# Altium PCB HSR_V2 - Copy.PcbDoc
Units mm, origin at the board's own origin, x right, y up, seen from the top; angles counter-clockwise.
Board outline 140 x 140 mm, 2 copper layers (Top Layer, Bottom Layer), stack 0.533 mm thick; 37 components, 46 nets, 224 pads, 805 vias.
Unrouted connection lines stored in the file: 1.
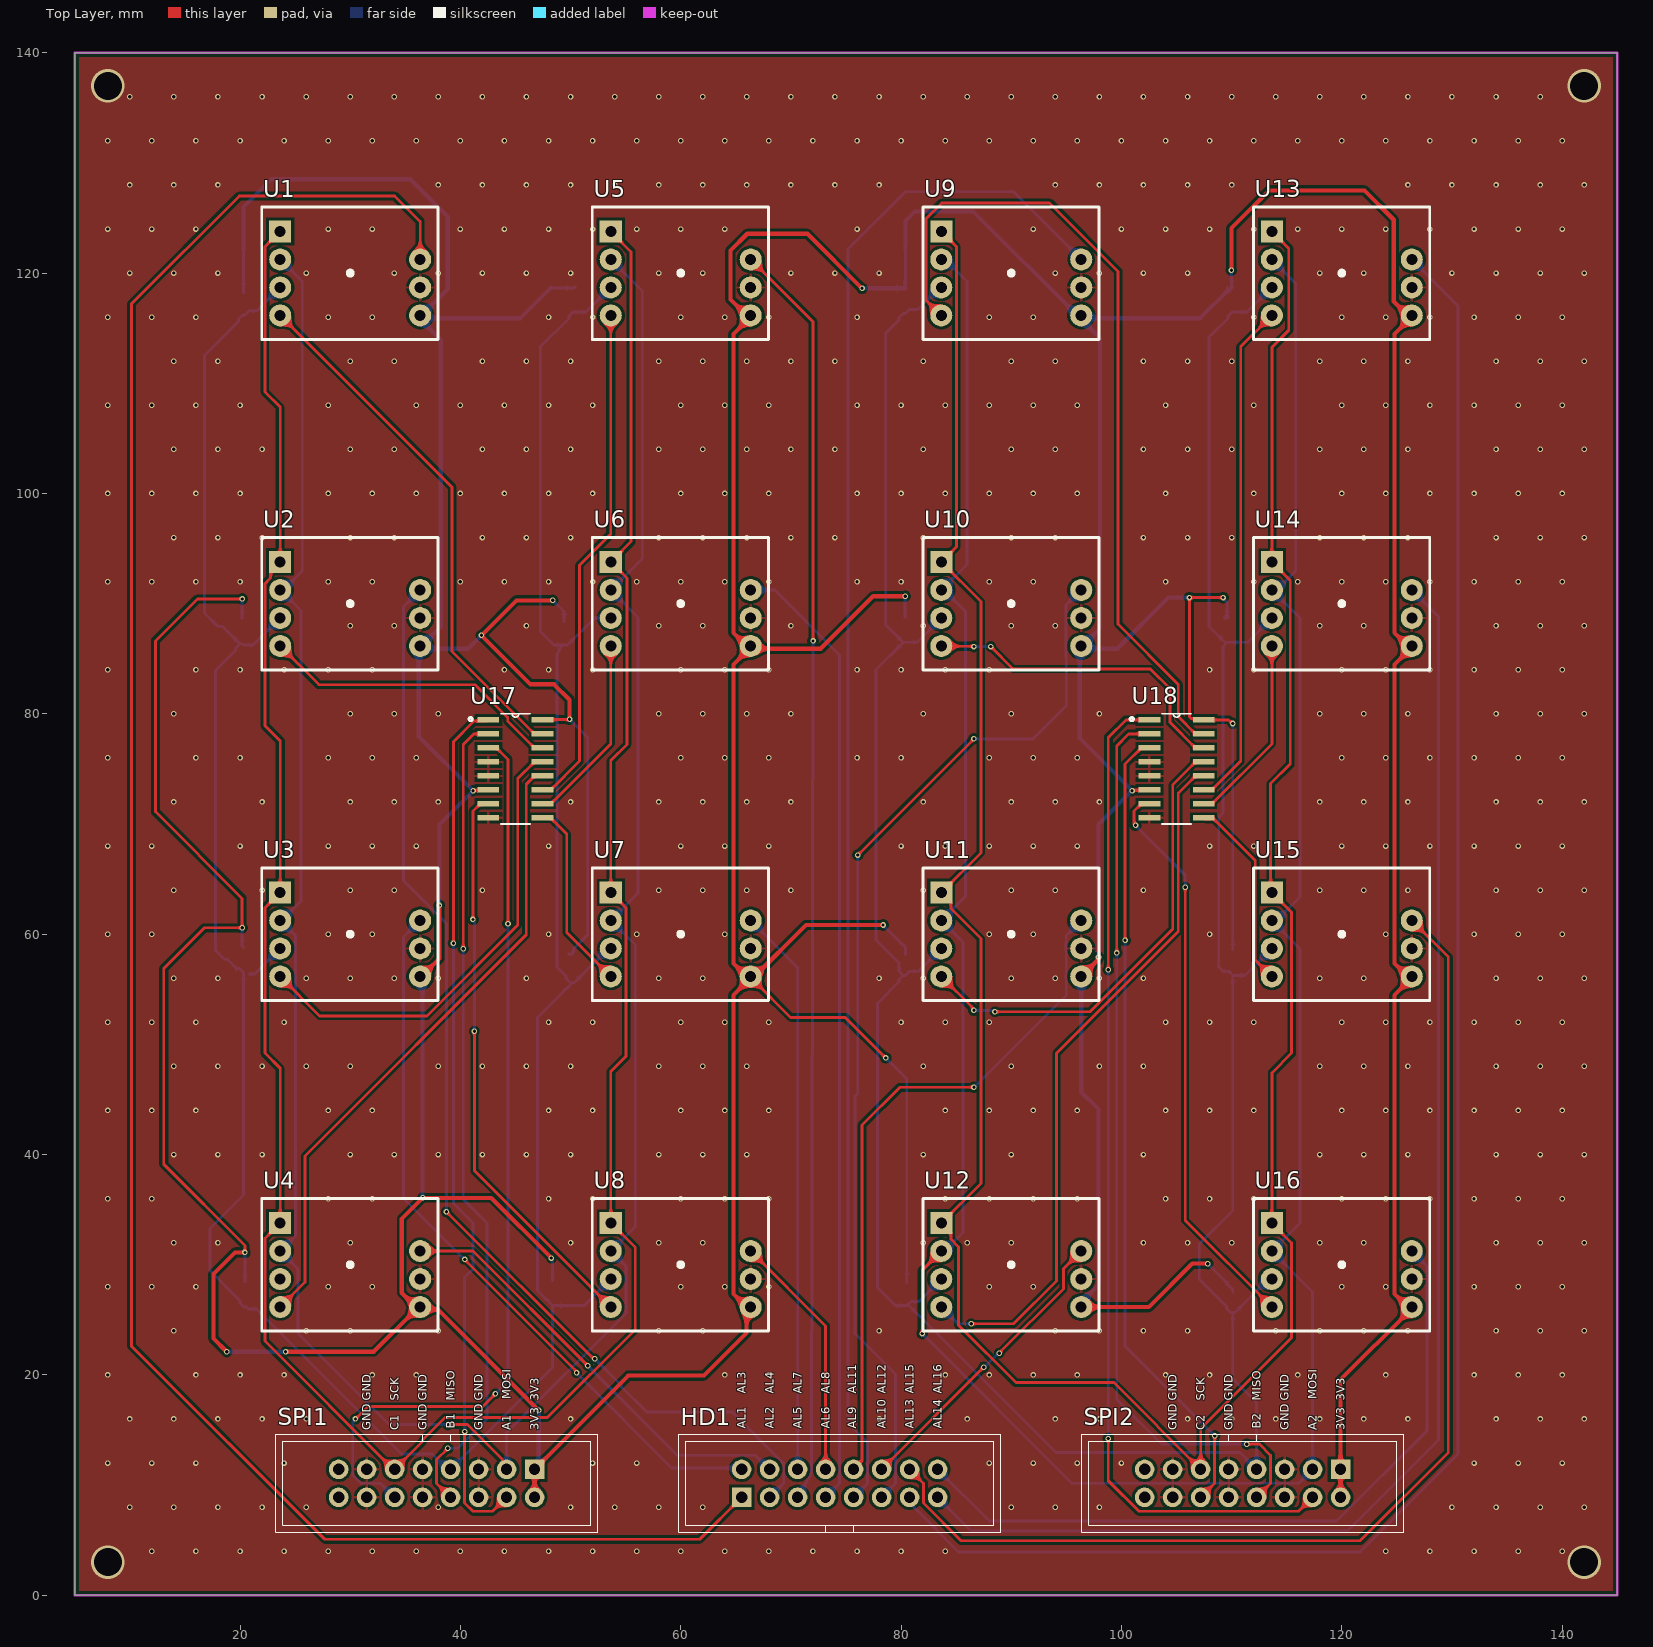
[diagram p0: Top Layer view]
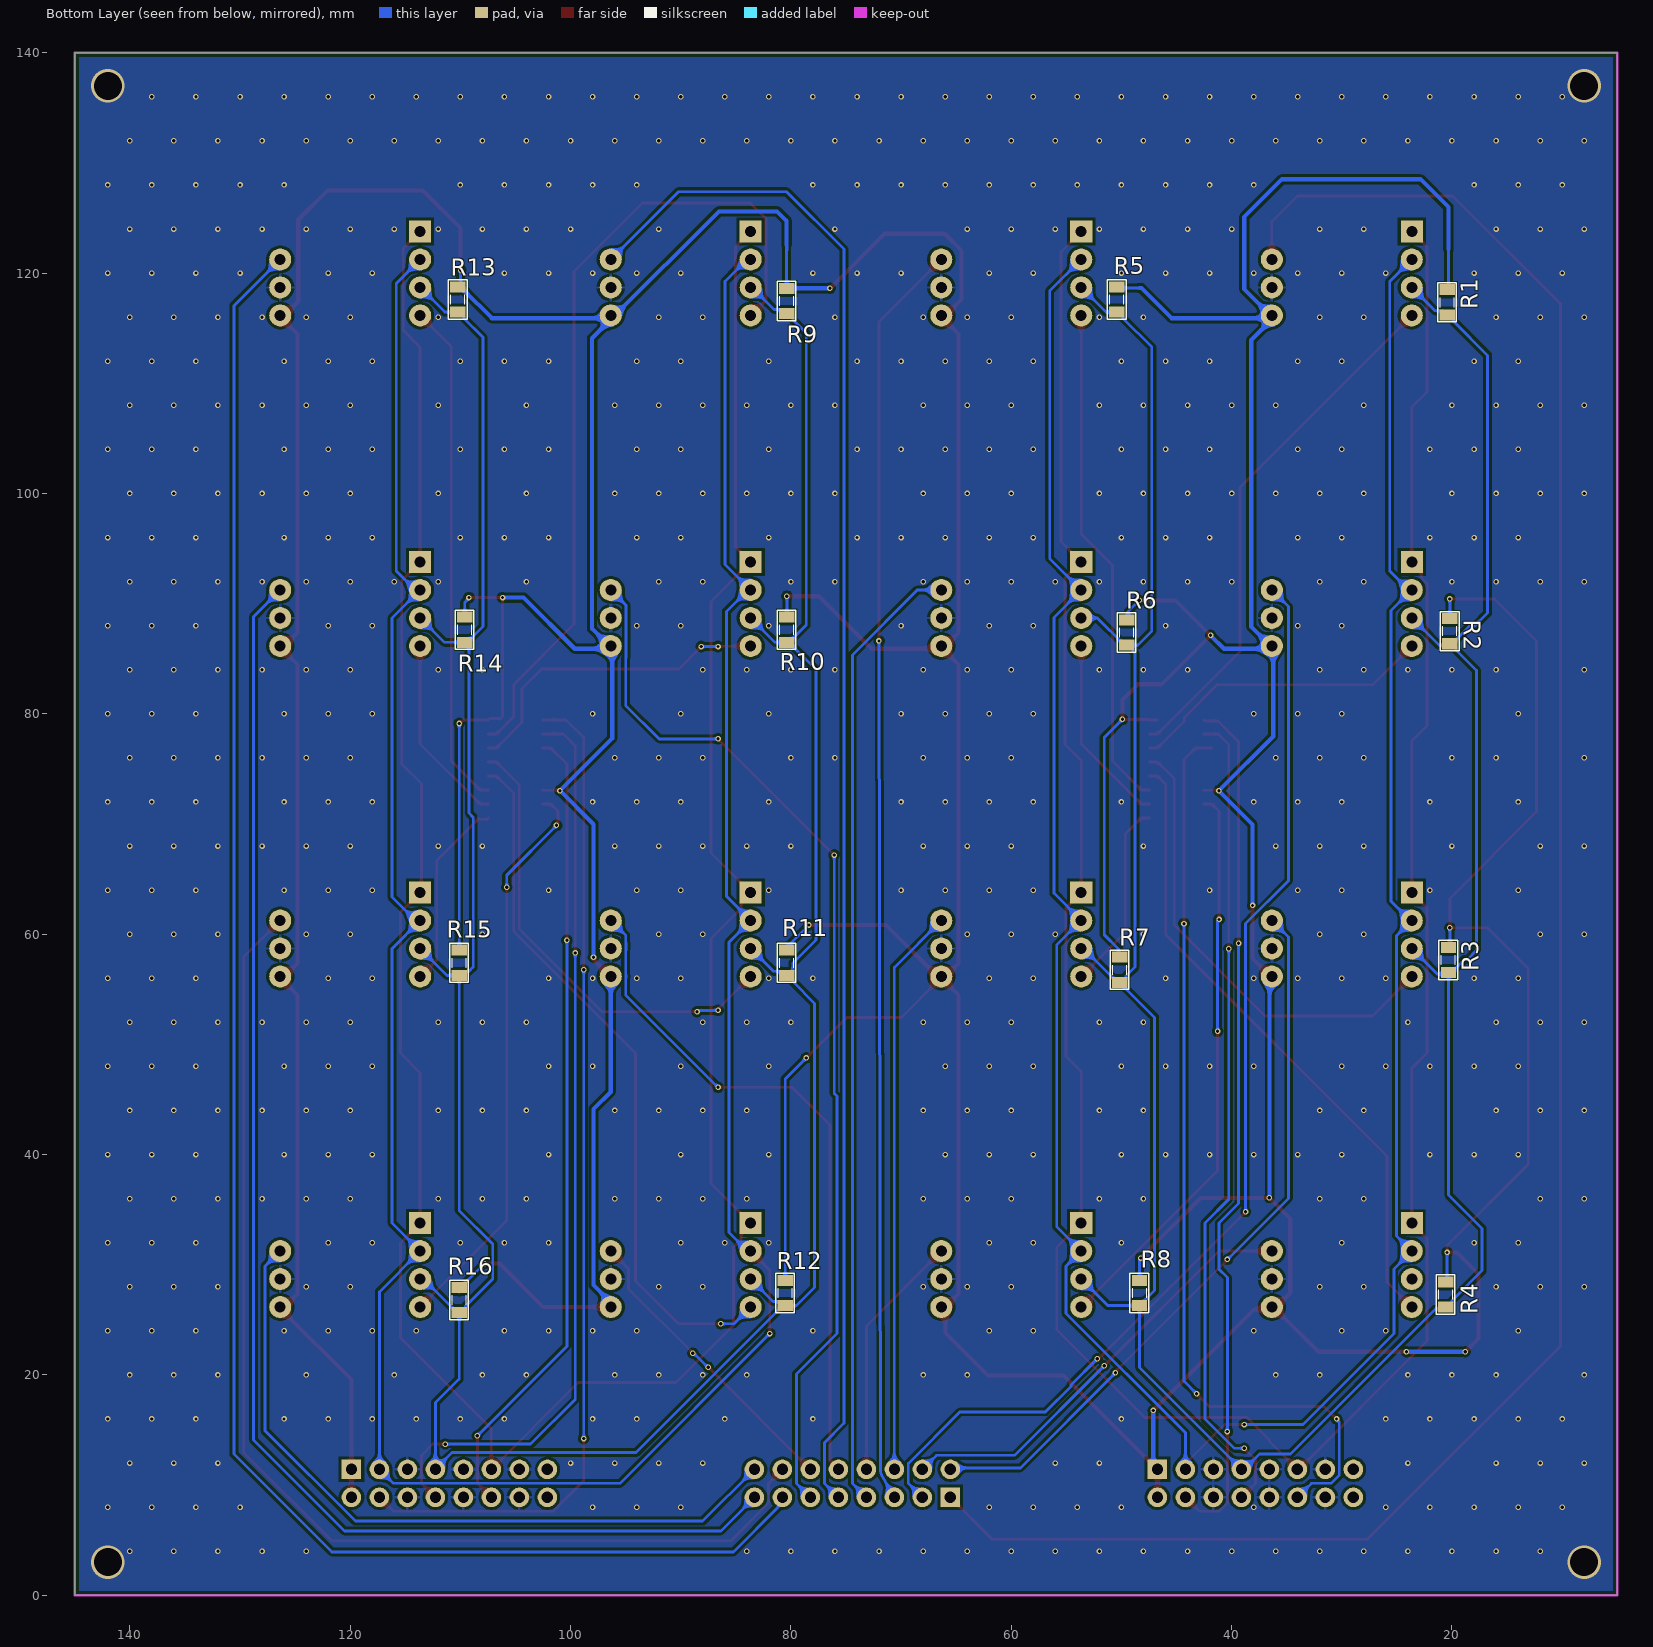
[diagram p1: Bottom Layer view, seen from below]
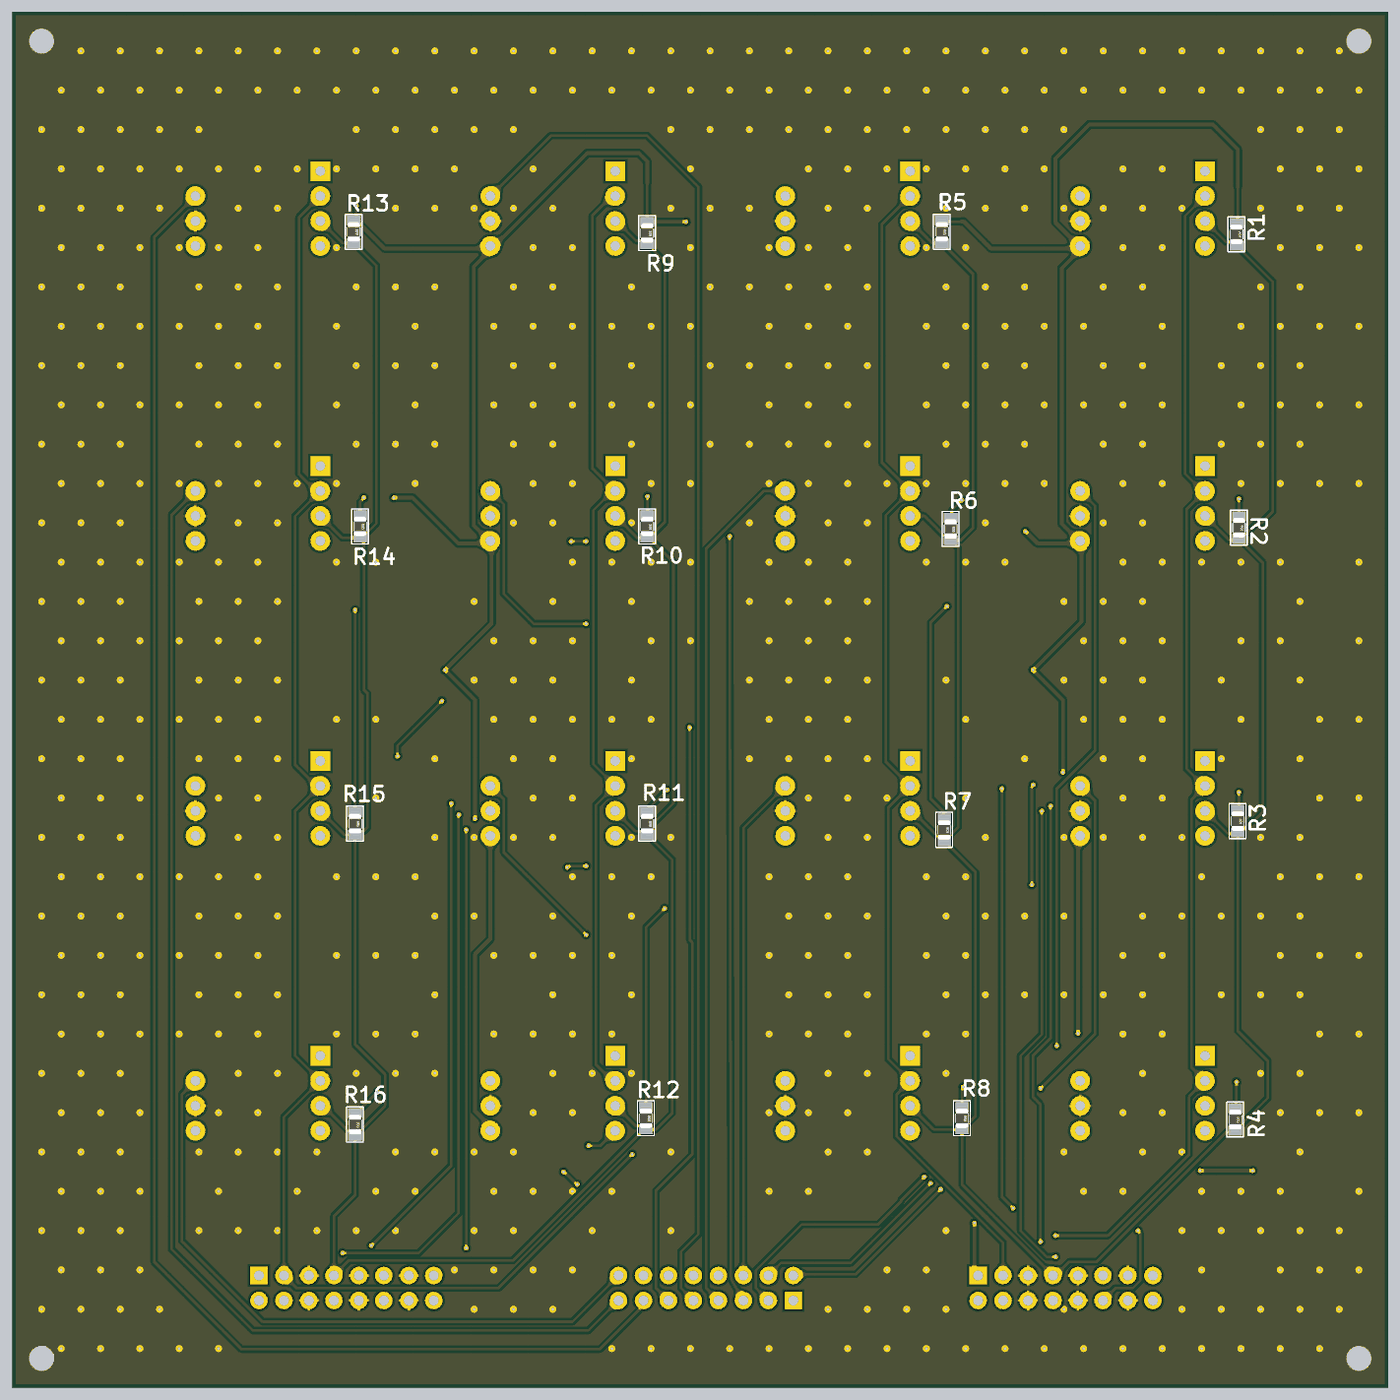
[diagram p2: 3D render of the assembled board from below, using the file's embedded part models]

## Layer stack, top to bottom
Top Solder: solder mask 0.0102, Solder Resist, Dk 3.5
Top Layer: signal copper 0.0356
Dielectric 2: prepreg 0.0711, PP-006, Dk 4.1
Dielectric 1: dielectric 0.32, FR-4, Dk 4.8
Dielectric 3: prepreg 0.0711, PP-006, Dk 4.1
Bottom Layer: signal copper 0.0356
Bottom Solder: solder mask 0.0102, Solder Resist, Dk 3.5

## Board outline
5,0 5,140 145,140 145,0

## Design rules (kind name [scope] priority, off if disabled: settings)
Clearance [All] p1: gap=0.254 ignorepadtopadclearanceinfootprint=FALSE
PolygonConnect [All] p1: connectstyle=Relief reliefconductorwidth=0.254 reliefentries=4 polygonreliefangle="90 Angle" airgapwidth=0.254
RoutingVias [All] p1: holewidth=0.3 width=0.5 viastyle="Through Hole" minholewidth=0.2 minwidth=0.3 maxholewidth=0.711 maxwidth=1.27
SolderMaskExpansion [All] p1: expansion=0.102 istentingtop=FALSE
Width [All] p1: maxlimit=0.762 minlimit=0.254 preferedwidth=0.254 minimp=50.000000 maximp=50.000000 favimp=50.000000
30 further rules are at their usual default settings.

## Classes and differential pairs
component class Sheet2: HD1 R1 R2 R3 R4 R5 R6 R7 R8 R9 R10 R11 R12 R13 R14 R15 R16 SPI1 SPI2 U1 U4 U5 U6 U7 U8 U9 U10 U11 U12 U13 U14 U15 U16 U17 U18

## Components (designator, comment, footprint, x,y, rotation, side; value= is the part's Value field where it differs from the comment)
HD1 "IDC 8X2" IDC16 65.532,8.89 r0 top value="Header 5x2"
R1 "10k" RES-SMD-0805 20.447,117.348 r270 bottom
R2 "10k" RES-SMD-0805 20.193,87.503 r270 bottom
R3 "10k" RES-SMD-0805 20.32,57.658 r270 bottom
R4 "10k" RES-SMD-0805 20.574,27.305 r270 bottom
R5 "10k" RES-SMD-0805 50.419,117.602 r270 bottom
R6 "10k" RES-SMD-0805 49.53,87.376 r270 bottom
R7 "10k" RES-SMD-0805 50.165,56.769 r270 bottom
R8 "10k" RES-SMD-0805 48.362,27.432 r270 bottom
R9 "10k" RES-SMD-0805 80.391,117.475 r270 bottom
R10 "10k" RES-SMD-0805 80.391,87.63 r270 bottom
R11 "10k" RES-SMD-0805 80.391,57.404 r270 bottom
R12 "10k" RES-SMD-0805 80.518,27.432 r270 bottom
R13 "10k" RES-SMD-0805 110.236,117.602 r270 bottom
R14 "10k" RES-SMD-0805 109.601,87.63 r270 bottom
R15 "10k" RES-SMD-0805 110.109,57.404 r270 bottom
R16 "10k" RES-SMD-0805 110.109,26.797 r270 bottom
SPI1 "IDC 8X2" IDC16 46.736,11.43 r180 top value="Header 5x2"
SPI2 "IDC 8X2" IDC16 119.888,11.43 r180 top value="Header 5x2"
U1 "TMAG5170_MODULE" "PCBComponent_1 - duplicate" 30,120 r0 top
U2 "TMAG5170_MODULE" "PCBComponent_1 - duplicate" 30,90 r0 top
U3 "TMAG5170_MODULE" "PCBComponent_1 - duplicate" 30,60 r0 top
U4 "TMAG5170_MODULE" "PCBComponent_1 - duplicate" 30,30 r0 top
U5 "TMAG5170_MODULE" "PCBComponent_1 - duplicate" 60,120 r0 top
U6 "TMAG5170_MODULE" "PCBComponent_1 - duplicate" 60,90 r0 top
U7 "TMAG5170_MODULE" "PCBComponent_1 - duplicate" 60,60 r0 top
U8 "TMAG5170_MODULE" "PCBComponent_1 - duplicate" 60,30 r0 top
U9 "TMAG5170_MODULE" "PCBComponent_1 - duplicate" 90,120 r0 top
U10 "TMAG5170_MODULE" "PCBComponent_1 - duplicate" 90,90 r0 top
U11 "TMAG5170_MODULE" "PCBComponent_1 - duplicate" 90,60 r0 top
U12 "TMAG5170_MODULE" "PCBComponent_1 - duplicate" 90,30 r0 top
U13 "TMAG5170_MODULE" "PCBComponent_1 - duplicate" 120,120 r0 top
U14 "TMAG5170_MODULE" "PCBComponent_1 - duplicate" 120,90 r0 top
U15 "TMAG5170_MODULE" "PCBComponent_1 - duplicate" 120,60 r0 top
U16 "TMAG5170_MODULE" "PCBComponent_1 - duplicate" 120,30 r0 top
U17 "SN74LVC138AD" SOIC127P600X175-16N 45,75 r0 top
U18 "SN74LVC138AD" SOIC127P600X175-16N 105,75 r0 top

## Footprints (in the part's own frame and the unit in brackets; to place one, negate y for a bottom-side part, rotate by r counter-clockwise, add the part's x,y. Pads: shape width x height; smd on the part's side, far side on the other; paste and mask are expansions set on the pad)
IDC16 [mil]
  rect 70x70 hole 40: 1(0,0)
  round 70 hole 40: 2(0,100) 3(100,0) 4(100,100) 5(200,0) 6(200,100) 7(300,0) 8(300,100) 9(400,0) 10(400,100) 11(500,0) 12(500,100) 13(600,0) 14(600,100) 15(700,0) 16(700,100)
  silkscreen extent -225,-125 925,225, body extent -225,-125 926,225, height 358
"PCBComponent_1 - duplicate" [mm]
  rect 2x2 hole 1 mask+0.05: 1(-6.35,3.778)
  round 2 hole 1 mask+0.05: 2(-6.35,1.238) 3(-6.35,-1.302) 4(-6.35,-3.842) 5(6.35,-3.842) 6(6.35,1.238) 7(6.35,-1.302)
  silkscreen extent -8.02,-6.03 7.97,6
RES-SMD-0805 [mm]
  rect 1x1.397 smd: 1(-1.143,0) 2(1.143,0)
  silkscreen extent -1.78,-0.86 1.78,0.84, body extent -1,-0.62 1,0.63, height 0.8
SOIC127P600X175-16N [mil]
  rect 78x20 smd: 1(-97,175) 2(-97,125) 3(-97,75) 4(-97,25) 5(-97,-25) 6(-97,-75) 7(-97,-125) 8(-97,-175) 9(97,-175) 10(97,-125) 11(97,-75) 12(97,-25) 13(97,25) 14(97,75) 15(97,125) 16(97,175)
  silkscreen extent -166,-197 52,197, body extent -118,-195 118,195, height 69

## Part data
HD1 SPI1 SPI2: library part "IDC 8x2"
R1 R2 R3 R4 R5 R6 R7 R8 R9 R10 R11 R12 R13 R14 R15 R16: library part "Resistor - SMD", "Resistor SMD", Manufacturer="Generic Components", Class=Passive, Published=08/06/2000, Publisher="Altium Hobart Technology Centre"
U1 U2 U3 U4 U5 U6 U7 U8 U9 U10 U11 U12 U13 U14 U15 U16: "Module TMAG5170 Hall sensor"
U17 U18: "3-Line To 8-Line decoder/Demultiplexer", Package="SOIC-16 Texas Instruments", Check_prices=https://www.snapeda.com/parts/SN74LVC138AD/Texas+Instruments/view-part/?ref=eda, MF="Texas Instruments", MP=SN74LVC138AD, SnapEDA_Link=https://www.snapeda.com/parts/SN74LVC138AD/Texas+Instruments/view-part/?ref=snap

## Via types
v1: diameter 0.5, hole 0.3, Top Layer to Bottom Layer, 742 vias
v2: diameter 0.5, hole 0.3, Top Layer to Bottom Layer, tented top, 59 vias
v3: diameter 3.048, hole 2.54, Top Layer to Bottom Layer, tented top, 4 vias

## Nets (pads, with @x,y where several pads share a name; then routed paths per layer and width w, separated by ;. In a path a pad name is that pad's centre, name@x,y a point inside that pad or via, vN(x,y) a via of type N, cw(c..) or ccw(c..) an arc to the next point about the centre after c; other vN are vias at no path point)
3V3: R1.1 R2.1 R3.1 R4.1 R5.1 R6.1 R7.1 R8.1 R9.1 R10.1 R11.1 R12.1 R13.1 R14.1 R15.1 R16.1 SPI1.1 SPI1.2 SPI2.1 SPI2.2 U1.5 U2.5 U3.5 U4.5 U5.5 U6.5 U7.5 U8.5 U9.5 U10.5 U11.5 U12.5 U13.5 U14.5 U15.5 U16.5 U17.6 U17.16 U18.6 U18.16 | length 930.7
  Top Layer w0.254: v2(20.193,90.424) 16.129,90.424 12.319,86.614 12.319,71.12 20.193,63.246 v2(20.193,60.579) 16.764,60.579 13.081,56.896 13.081,39.116 20.447,31.75 v2(20.447,31.115) ; v2(41.148,73.025) 41.183,73.06 42.501,73.06 U17.6 ; U17.16@46.727,79.445 U17.16 47.492,79.474 49.883,79.474 v2(49.911,79.502) ; U7.5@66.52,55.908 69.977,52.451 74.93,52.451 v2(78.613,48.768) ; v2(100.965,73.025) 101,73.06 102.501,73.06 U18.6 ; v2(109.22,90.551) v2(106.172,90.551) 106.172,79.721 106.321,79.572 107.337,79.572 U18.16 109.718,79.445 110.042,79.121 v2(110.109,79.121)
  Top Layer w0.381: v2(18.796,22.098) 17.59,23.304 17.59,29.146 19.558,31.115 v2(20.447,31.115) ; v2(24.13,22.098) 32.131,22.098 35.941,25.908 U4.5@36.223,25.908 ; U3.5@36.223,55.908 36.223,55.917 38.1,57.794 v2(38.1,62.611) ; U4.5@36.239,25.908 U4.5@36.223,25.908 ; U4.5 36.581,25.927 37.954,25.927 v2(47.109,16.772) ; SPI1.2 SPI1.1 55.245,19.939 62.103,19.939 65.973,23.809 65.973,25.657 66.223,25.908 64.779,27.352 64.779,54.463 U7.5@66.223,55.908 ; v2(48.26,30.607) 42.799,36.068 v2(36.576,36.068) 34.671,34.163 34.671,27.46 U4.5@36.223,25.908 ; v2(48.387,90.297) 45.085,90.297 v2(41.91,87.122) 46.355,82.677 48.514,82.677 49.911,81.28 v2(49.911,79.502) ; v2(76.454,118.618) 71.501,123.571 66.04,123.571 64.516,122.047 64.516,117.615 66.223,115.908 64.779,114.463 64.779,87.352 U6.5@66.223,85.908 ; v2(78.359,60.833) 71.374,60.833 66.449,55.908 U7.5@66.223,55.908 ; v2(80.366,90.678) 77.47,90.678 72.7,85.908 U6.5@66.223,85.908 ; U12.5 102.485,26.158 106.426,30.099 v2@107.791,30.099 ; U11.5 97.894,57.702 97.894,57.889 v2(97.917,57.912) ; v2(109.982,120.269) 109.982,124.079 113.411,127.508 122.047,127.508 124.714,124.841 124.714,117.417 126.223,115.908 124.779,114.463 124.779,87.352 126.223,85.908 124.779,84.463 124.779,57.352 126.223,55.908 124.779,54.463 124.779,27.352 126.223,25.908 119.888,19.572 SPI2.1 SPI2.2 ; U7.5@66.223,55.908 64.779,57.352 64.779,84.463 U6.5@66.223,85.908
  Bottom Layer w0.254: v2(20.193,60.579) 20.193,58.928 R3.1 ; R2.1 v2(20.193,90.424) ; R1.1@20.32,118.217 20.32,122.174 ; R4.1@20.447,28.448 v2(20.447,31.115) ; R8.1 v2@48.362,30.439 ; v2(48.387,90.297) 49.403,89.281 R6.1@49.403,88.363 ; 48.387,118.643 50.317,118.643 R5.1 ; R7.1@49.821,58.203 50.181,58.203 50.262,58.285 50.262,58.644 51.562,59.944 51.562,77.851 v2(49.911,79.502) ; v2(78.359,60.833) 80.391,58.801 R11.1 R11.1@80.391,58.173 ; v2(78.613,48.768) 80.518,46.863 R12.1 R12.1@80.518,28.394 ; v2(80.366,90.678) 80.366,88.798 R10.1 ; R9.1 80.391,122.555 ; v2(107.823,30.099) 109.537,28.384 109.537,28.313 110.038,27.813 110.109,27.813 R16.1@110.109,27.51 ; v2(109.22,90.551) 109.22,90.484 109.601,90.103 R14.1 ; v2(109.982,120.269) 109.982,118.872 R13.1@110.045,118.808 ; R15.1@110.109,58.589 v2(110.109,79.121)
  Bottom Layer w0.381: v2(18.796,22.098) v2(24.13,22.098) ; 20.32,122.174 20.32,125.984 22.86,128.524 35.433,128.524 38.862,125.095 38.862,118.546 U1.5@36.223,115.908 ; U3.5@36.223,55.908 36.553,55.578 36.553,36.091 v2(36.576,36.068) ; v2(38.1,62.611) 38.1,69.953 41.148,73.001 v2(41.148,73.025) 36.223,77.95 U2.5@36.223,85.908 ; v2(41.91,87.122) 40.696,85.908 U2.5@36.223,85.908 ; SPI1.1 47.109,11.803 v2@47.109,16.739 ; 48.387,118.643 48.189,118.643 45.453,115.908 U1.5@36.223,115.908 ; v2(76.454,118.618) R9.1 ; 80.391,122.555 80.391,124.745 81.249,125.603 86.528,125.603 U9.5@96.223,115.908 ; U12.5 96.35,26.596 97.917,28.163 97.917,44.116 96.35,45.683 U11.5 ; v2(97.917,57.912) 97.917,69.977 v2(100.965,73.025) 96.223,77.767 U10.5@96.223,85.908 ; v2(106.172,90.551) 104.267,90.551 99.624,85.908 U10.5@96.223,85.908 ; R14.1 R14.1@109.474,88.773 ; R13.1@110.045,118.808 110.045,118.753 109.728,118.436 109.673,118.436 107.145,115.908 U9.5@96.223,115.908 ; U2.5@36.223,85.908 38.227,87.911 38.227,113.904 U1.5@36.223,115.908 ; U10.5@96.223,85.908 98.044,87.728 98.044,114.087 U9.5@96.223,115.908 ; R14.1@109.474,88.773 109.474,88.702 109.403,88.773 R14.1@109.474,88.773
A1: SPI1.4 U17.1 | length 78.8
  Top Layer w0.254: v2(39.37,59.182) 39.37,77.47 41.239,79.339 42.431,79.339 U17.1 ; v2(40.386,14.859) 40.386,8.364 41.13,7.62 42.926,7.62 SPI1.4
  Bottom Layer w0.254: v2(39.37,59.182) 39.37,35.56 41.148,33.782 41.148,29.591 40.386,28.829 v2(40.386,14.859)
A2: SPI2.4 U18.1 | length 92.1
  Top Layer w0.254: v2(98.806,14.224) 98.806,10.396 101.582,7.62 116.078,7.62 SPI2.4 ; v2(98.806,56.769) 98.806,77.851 100.4,79.445 U18.1
  Bottom Layer w0.254: v2(98.806,14.224) v2(98.806,56.769)
AL1: HD1.1 U1.6 | length 193.5
  Top Layer w0.254: U1.6 36.35,124.686 34.036,127 19.939,127 10.16,117.221 10.16,22.606 27.686,5.08 61.722,5.08 HD1.1
AL2: HD1.3 U2.6 | length 102.4
  Top Layer w0.254: v2(38.735,34.798) 52.023,21.51 52.15,21.51 v2(52.197,21.463)
  Bottom Layer w0.254: U2.6 34.842,89.73 34.842,64.853 38.735,60.96 v2(38.735,34.798) ; v2(52.197,21.463) 54.577,19.083 54.577,18.956 56.91,16.623 64.676,16.623 69.342,11.956 69.342,10.16 HD1.3
AL3: HD1.2 U3.6 | length 66.8
  Top Layer w0.254: v2(40.386,30.48) 50.499,20.367 50.499,20.24 v2(50.546,20.193)
  Bottom Layer w0.254: U3.6 34.842,59.73 34.842,36.024 v2(40.386,30.48) ; v2(50.546,20.193) 59.179,11.56 65.402,11.56 HD1.2
AL4: HD1.4 U4.6 | length 39.9
  Top Layer w0.254: U4.6 41.152,31.238 v2(51.562,20.828)
  Bottom Layer w0.254: v2(51.562,20.828) 59.69,12.7 66.802,12.7 HD1.4
AL5: HD1.5 U5.6 | length 115.7
  Top Layer w0.254: U5.6 72.009,115.579 v2(72.009,86.614)
  Bottom Layer w0.254: HD1.5 71.712,10.795 ; v2(72.009,86.614) 71.882,11.432 ; 71.712,10.795 ccw(c70.612,11.43) 71.882,11.432 ; 71.712,10.795 ccw(c70.612,11.43) 71.882,11.432
AL6: HD1.7 U6.6 | length 87.5
  Bottom Layer w0.254: U6.6 68.528,91.238 74.422,85.344 74.422,10.16 HD1.7
AL7: HD1.6 U7.6 | length 51.6
  Bottom Layer w0.254: U7.6 70.612,56.976 HD1.6
AL8: HD1.8 U8.6 | length 22.6
  Top Layer w0.254: U8.6 73.152,24.436 HD1.8
AL9: HD1.9 U9.6 | length 140.4
  Bottom Layer w0.254: HD1.9 76.962,10.16 76.962,13.843 75.184,15.621 75.184,122.174 80.391,127.381 90.207,127.381 U9.6
AL10: HD1.11 U10.6 | length 96.1
  Top Layer w0.254: v2(76.073,67.183) 76.073,67.185 86.61,77.722 v2(86.61,77.724)
  Bottom Layer w0.254: v2(76.073,67.183) 76.073,45.56 75.819,45.306 75.819,23.749 79.502,20.066 79.502,10.16 HD1.11 ; v2(86.61,77.724) 91.948,77.724 94.996,80.772 94.996,85.065 94.969,85.092 94.969,89.857 U10.6
AL11: HD1.10 U11.6 | length 63.2
  Top Layer w0.254: HD1.10 75.692,11.492 76.454,12.254 76.454,42.676 79.879,46.101 v2(86.61,46.101)
  Bottom Layer w0.254: v2(86.61,46.101) 94.996,54.487 94.996,55.886 ; U11.6 95.07,59.958 94.996,59.884 94.969,58.731 ; 94.969,58.731 ccw(c96.35,58.698) 94.996,58.426 ; 94.969,58.731 ccw(c96.35,58.698) 94.996,58.426 ; 94.996,55.886 cw(c96.35,56.158) 94.996,56.43 ; 94.996,55.886 cw(c96.35,56.158) 94.996,56.43 ; 94.996,56.43 94.996,58.426
AL12: HD1.12 U12.6 | length 27.4
  Top Layer w0.254: HD1.12 v2(87.503,20.701) ; v2(88.9,21.971) 94.742,27.813 94.742,29.63 U12.6
  Bottom Layer w0.254: v2(87.503,20.701) 87.566,20.701 88.837,21.971 v2(88.9,21.971)
AL13: HD1.13 U13.6 | length 166
  Bottom Layer w0.254: HD1.13 80.772,8.478 81.162,8.088 81.162,7.992 85.217,3.937 121.666,3.937 130.556,12.827 130.556,117.032 U13.6
AL14: HD1.15 U14.6 | length 128.3
  Bottom Layer w0.254: HD1.15 86.36,5.842 120.523,5.842 128.778,14.097 128.778,88.81 U14.6
AL15: HD1.14 U15.6 | length 105.6
  Top Layer w0.254: HD1.14 82.042,10.16 82.042,8.364 85.453,4.953 121.666,4.953 129.667,12.954 129.667,57.921 U15.6
AL16: HD1.16 U16.6 | length 66.6
  Bottom Layer w0.254: HD1.16 88.011,6.731 119.525,6.731 127.731,14.937 127.731,29.857 U16.6
B1: SPI1.8 U17.2 | length 74.8
  Top Layer w0.254: v2(38.862,13.335) 37.846,12.319 37.846,10.16 SPI1.8 ; v2(40.259,58.674) 40.259,77.216 41.218,78.175 U17.2
  Bottom Layer w0.254: v2(38.862,13.335) 39.754,13.335 42.418,15.999 42.418,33.782 40.259,35.941 v2(40.259,58.674)
B2: SPI2.8 U18.2 | length 83.1
  Top Layer w0.254: v2(99.568,58.293) 99.568,77.089 100.654,78.175 U18.2 ; v2(111.379,13.716) 112.522,13.716 113.538,12.7 113.538,10.16 SPI2.8
  Bottom Layer w0.254: v2(99.568,58.293) 99.568,17.78 103.632,13.716 v2(111.379,13.716)
C1: SPI1.12 U17.3 | length 84.7
  Top Layer w0.254: v2(30.48,16.002) 31.623,17.145 42.037,17.145 v2(43.18,18.288) ; SPI1.12@33.909,9.017 SPI1.12 ; U17.3@41.8,76.905 U17.3 43.273,76.905 44.323,75.855 v2(44.323,60.96)
  Bottom Layer w0.254: v2(30.48,16.002) 30.48,15.935 30.226,15.681 30.226,10.904 30.97,10.16 32.766,10.16 SPI1.12 ; v2(43.18,18.288) 44.323,19.431 v2(44.323,60.96)
C2: SPI2.12 U18.3 | length 73.3
  Top Layer w0.254: v2(100.33,59.436) 100.33,75.435 101.8,76.905 U18.3 ; SPI2.12 108.458,10.16 v2(108.458,14.478)
  Bottom Layer w0.254: v2(100.33,59.436) 100.33,22.606 v2(108.458,14.478)
GND: SPI1.5 SPI1.6 SPI1.9 SPI1.10 SPI1.13 SPI1.14 SPI2.5 SPI2.6 SPI2.9 SPI2.10 SPI2.13 SPI2.14 U1.7 U2.7 U3.7 U4.7 U5.7 U6.7 U7.7 U8.7 U9.7 U10.7 U11.7 U12.7 U13.7 U14.7 U15.7 U16.7 U17.4 U17.5 U17.8 U18.4 U18.5 U18.8
  other v1: 12,4 16,4 20,4 24,4 28,4 32,4 36,4 40,4 44,4 48,4 52,4 56,4 60,4 64,4 68,4 72,4 76,4 80,4 84,4 124,4 128,4 132,4 136,4 140,4 10,8 14,8 18,8 22,8 26,8 38,8 50,8 54,8 58,8 62,8 90,8 94,8 98,8 130,8 134,8 138,8 142,8 8,12 12,12 16,12 24,12 52,12 56,12 88,12 92,12 96,12 100,12 132,12 136,12 140,12 10,16 14,16 18,16 22,16 26,16 50,16 78,16 86,16 94,16 98,16 106,16 110,16 114,16 118,16 122,16 126,16 134,16 138,16 142,16 8,20 16,20 20,20 24,20 32,20 36,20 64,20 68,20 84,20 88,20 92,20 96,20 104,20 108,20 116,20 124,20 132,20 136,20 140,20 14,24 26,24 30,24 38,24 58,24 62,24 78,24 94,24 98,24 102,24 106,24 114,24 118,24 122,24 126,24 134,24 138,24 142,24 8,28 12,28 16,28 28,28 32,28 60,28 64,28 68,28 88,28 92,28 120,28 124,28 132,28 136,28 140,28 14,32 18,32 30,32 50,32 58,32 62,32 82,32 86,32 90,32 102,32 106,32 110,32 118,32 122,32 134,32 138,32 142,32 8,36 12,36 28,36 32,36 48,36 52,36 60,36 64,36 68,36 84,36 88,36 92,36 96,36 104,36 108,36 112,36 120,36 124,36 128,36 132,36 136,36 140,36 14,40 18,40 22,40 30,40 34,40 38,40 42,40 46,40 50,40 58,40 62,40 66,40 82,40 90,40 102,40 118,40 122,40 126,40 134,40 138,40 142,40 8,44 12,44 16,44 28,44 32,44 48,44 52,44 60,44 64,44 68,44 84,44 88,44 92,44 96,44 104,44 108,44 112,44 120,44 124,44 128,44 132,44 136,44 140,44 14,48 18,48 22,48 26,48 30,48 38,48 42,48 46,48 50,48 58,48 62,48 66,48 82,48 90,48 98,48 102,48 118,48 122,48 126,48 134,48 138,48 142,48 8,52 12,52 16,52 24,52 48,52 52,52 60,52 64,52 68,52 80,52 84,52 88,52 104,52 108,52 112,52 120,52 124,52 128,52 132,52 136,52 140,52 14,56 18,56 26,56 30,56 34,56 38,56 46,56 58,56 62,56 78,56 82,56 90,56 94,56 98,56 102,56 118,56 122,56 134,56 138,56 142,56 8,60 12,60 28,60 32,60 48,60 56,60 60,60 64,60 88,60 92,60 108,60 120,60 124,60 132,60 136,60 140,60 14,64 22,64 30,64 34,64 42,64 58,64 62,64 66,64 70,64 82,64 90,64 94,64 102,64 118,64 122,64 126,64 134,64 138,64 142,64 8,68 12,68 20,68 28,68 32,68 36,68 48,68 60,68 64,68 68,68 80,68 84,68 88,68 92,68 96,68 108,68 112,68 120,68 124,68 128,68 132,68 136,68 140,68 14,72 22,72 30,72 34,72 38,72 50,72 58,72 62,72 66,72 70,72 82,72 90,72 94,72 98,72 118,72 122,72 126,72 134,72 138,72 142,72 8,76 16,76 20,76 28,76 32,76 36,76 60,76 64,76 68,76 76,76 80,76 88,76 92,76 96,76 120,76 124,76 128,76 132,76 136,76 140,76 14,80 30,80 34,80 38,80 58,80 62,80 66,80 70,80 82,80 90,80 98,80 118,80 122,80 126,80 134,80 138,80 142,80 8,84 16,84 20,84 24,84 28,84 32,84 44,84 48,84 52,84 60,84 64,84 68,84 76,84 80,84 84,84 88,84 108,84 112,84 120,84 124,84 128,84 132,84 136,84 140,84 30,88 34,88 46,88 58,88 62,88 70,88 82,88 90,88 94,88 118,88 122,88 134,88 138,88 142,88 8,92 12,92 16,92 20,92 28,92 32,92 40,92 44,92 48,92 52,92 56,92 60,92 64,92 68,92 76,92 80,92 88,92 92,92 104,92 112,92 116,92 120,92 124,92 128,92 132,92 136,92 140,92 14,96 18,96 22,96 30,96 34,96 42,96 46,96 50,96 58,96 62,96 66,96 70,96 74,96 82,96 90,96 94,96 102,96 106,96 110,96 118,96 122,96 126,96 134,96 138,96 142,96 8,100 12,100 16,100 20,100 28,100 32,100 36,100 40,100 44,100 48,100 52,100 60,100 64,100 68,100 76,100 80,100 84,100 88,100 92,100 96,100 104,100 112,100 120,100 124,100 128,100 132,100 136,100 140,100 14,104 18,104 22,104 30,104 34,104 42,104 46,104 50,104 58,104 62,104 66,104 70,104 74,104 82,104 90,104 94,104 102,104 106,104 110,104 118,104 122,104 126,104 134,104 138,104 142,104 8,108 12,108 16,108 20,108 28,108 36,108 40,108 44,108 48,108 52,108 60,108 64,108 68,108 76,108 80,108 84,108 88,108 92,108 96,108 104,108 112,108 120,108 124,108 128,108 132,108 136,108 140,108 14,112 18,112 30,112 34,112 42,112 46,112 50,112 58,112 62,112 66,112 70,112 74,112 82,112 90,112 94,112 102,112 106,112 110,112 118,112 122,112 126,112 134,112 138,112 142,112 8,116 12,116 16,116 28,116 32,116 48,116 52,116 60,116 64,116 68,116 76,116 88,116 92,116 112,116 120,116 124,116 128,116 132,116 136,116 140,116 10,120 14,120 18,120 26,120 30,120 34,120 38,120 42,120 46,120 50,120 58,120 62,120 70,120 74,120 78,120 90,120 94,120 98,120 102,120 106,120 118,120 122,120 130,120 134,120 138,120 142,120 8,124 12,124 16,124 28,124 32,124 40,124 44,124 48,124 52,124 56,124 60,124 64,124 76,124 92,124 100,124 104,124 108,124 112,124 116,124 120,124 124,124 128,124 132,124 136,124 140,124 10,128 14,128 18,128 38,128 42,128 46,128 50,128 54,128 58,128 62,128 66,128 70,128 74,128 78,128 94,128 98,128 102,128 106,128 110,128 126,128 130,128 134,128 138,128 142,128 8,132 12,132 16,132 20,132 24,132 28,132 32,132 36,132 40,132 44,132 48,132 52,132 56,132 60,132 64,132 68,132 72,132 76,132 80,132 84,132 88,132 92,132 96,132 100,132 104,132 108,132 112,132 116,132 120,132 124,132 128,132 132,132 136,132 140,132 10,136 14,136 18,136 22,136 26,136 30,136 34,136 38,136 42,136 46,136 50,136 54,136 58,136 62,136 66,136 70,136 74,136 78,136 82,136 86,136 90,136 94,136 98,136 102,136 106,136 110,136 114,136 118,136 122,136 126,136 130,136 134,136 138,136
  other v3: 8,3 142,3 8,137 142,137
SENS1: U1.4 U17.15 | length 48.3
  Top Layer w0.254: U1.4 31.985,107.823 39.243,100.565 39.243,85.659 46.727,78.175 U17.15
SENS2: U2.4 U17.14 | length 27.8
  Top Layer w0.254: U2.4 27.161,82.647 41.305,82.647 44.294,79.658 44.294,79.338 46.727,76.905 U17.14
SENS3: U3.4 U17.13 | length 42.6
  Top Layer w0.254: U3.4 27.23,52.578 36.96,52.578 45.212,60.83 45.212,74.12 46.727,75.635 U17.13
SENS4: U4.4 U17.12 | length 58.5
  Top Layer w0.254: U4.4 25.908,28.415 25.908,39.878 45.974,59.944 45.974,73.612 46.727,74.365 U17.12
SENS5: U5.4 U17.11 | length 46.1
  Top Layer w0.254: U17.11 48.2,73.095 50.822,75.716 50.822,93.488 53.65,96.317 U5.4
SENS6: U6.4 U17.10 | length 17.3
  Top Layer w0.254: U17.10 48.2,71.825 53.65,77.275 U6.4
SENS7: U7.4 U17.9 | length 17.4
  Top Layer w0.254: U17.9 48.2,70.555 49.657,69.098 49.657,60.151 U7.4
SENS8: U8.4 U17.7 | length 51.9
  Top Layer w0.254: v2(41.144,61.341) 41.144,71.169 41.8,71.825 U17.7 ; v2(41.275,51.181) 41.275,38.533 U8.4
  Bottom Layer w0.254: v2(41.144,61.341) 41.144,61.274 41.275,61.143 v2(41.275,51.181)
SENS9: U9.4 U18.15 | length 75.6
  Top Layer w0.254: U9.4 82.269,117.539 82.269,124.936 83.699,126.365 93.472,126.365 99.695,120.142 99.695,88.138 105.156,82.677 105.156,79.746 106.727,78.175 U18.15
SENS10: U10.4 U18.14 | length 29.4
  Top Layer w0.254: U10.4 83.676,86.132 86.588,86.132 v2(86.614,86.106) ; v2(88.138,86.106) 90.17,84.074 102.616,84.074 104.394,82.296 104.394,79.238 106.727,76.905 U18.14
  Bottom Layer w0.254: v2(86.614,86.106) v2(88.138,86.106)
SENS11: U11.4 U18.13 | length 42.3
  Top Layer w0.254: U11.4 86.563,53.245 86.563,53.133 v2(86.61,53.086) ; v2(88.519,52.959) 97.155,52.959 104.648,60.452 104.648,73.556 106.727,75.635 U18.13
  Bottom Layer w0.254: v2(86.61,53.086) 88.325,53.086 88.452,52.959 v2(88.519,52.959)
SENS12: U12.4 U18.12 | length 64.5
  Top Layer w0.254: v2(86.36,24.638) 90.217,24.638 94.107,28.528 94.107,49.193 105.156,60.242 105.156,72.794 105.23,72.868 106.727,74.365 U18.12
  Bottom Layer w0.254: U12.4 85.17,24.638 v2(86.36,24.638)
SENS13: U13.4 U18.11 | length 46.1
  Top Layer w0.254: U18.11 108.2,73.095 110.822,75.716 110.822,113.329 U13.4
SENS14: U14.4 U18.10 | length 17.3
  Top Layer w0.254: U18.10 108.2,71.825 113.65,77.275 U14.4
SENS15: U15.4 U18.9 | length 17.4
  Top Layer w0.254: U18.9 107.591,70.428 108.388,70.428 112.141,66.675 112.141,57.667 U15.4
SENS16: U16.4 U18.7 | length 51.9
  Top Layer w0.254: v2(101.278,69.874) 101.278,69.94 101.151,70.067 101.151,71.177 101.8,71.825 U18.7 ; v2(105.791,64.262) 105.787,64.258 105.787,34.021 U16.4
  Bottom Layer w0.254: v2(101.278,69.874) 101.278,69.86 105.791,65.347 v2(105.791,64.262)
SPI1_MISO: R1.2 R2.2 R3.2 R4.2 R5.2 R6.2 R7.2 R8.2 SPI1.7 U1.3 U2.3 U3.3 U4.3 U5.3 U6.3 U7.3 U8.3 | length 270.7
  Bottom Layer w0.254: R3.2@20.828,56.388 21.341,56.388 U3.3 ; U2.3 21.186,86.233 20.32,86.233 R2.2 R2.2@19.995,86.36 ; U1.3 21.531,116.578 20.82,116.578 R1.2 20.249,116.205 19.875,115.832 19.875,115.634 16.764,112.522 16.764,89.154 17.974,87.944 18.411,87.944 R2.2@19.995,86.36 ; U8.3 51.242,26.289 R8.2 ; U7.3 53.435,58.698 50.363,55.626 R7.2 ; U6.3 52.193,88.698 49.728,86.233 R6.2 R6.2@49.332,86.233 ; U5.3 51.412,116.459 R5.2 50.221,116.459 49.847,116.086 49.847,115.888 47.244,113.284 47.244,87.503 48.514,86.233 R6.2@49.332,86.233 ; R2.2@19.995,86.36 19.621,85.987 19.621,85.789 17.78,83.947 17.78,58.547 18.609,57.718 18.863,57.718 19.693,56.888 19.947,56.888 R3.2 20.32,36.322 17.272,33.274 17.272,29.464 20.002,26.734 20.002,26.535 20.376,26.162 R4.2 20.743,25.993 21.505,25.993 34.671,12.827 37.462,12.827 38.859,11.43 SPI1.7 48.362,20.676 R8.2 ; R8.2 46.99,27.661 46.99,52.451 R7.2 ; R6.2@49.332,86.233 48.959,85.86 48.959,85.662 48.768,85.471 48.768,57.023 49.593,56.198 49.593,55.999 49.967,55.626 R7.2
SPI1_MOSI: SPI1.3 U1.2 U2.2 U3.2 U4.2 U5.2 U6.2 U7.2 U8.2 | length 248.2
  Top Layer w0.254: v2(38.862,15.494) 40.643,15.494 43.808,12.33 43.808,12.231 44.196,11.842 SPI1.3
  Bottom Layer w0.254: U3.2 U3.2@23.712,61.238 ; U1.2 25.654,119.234 25.654,92.964 23.928,91.238 U2.2 25.527,89.361 25.527,62.992 23.773,61.238 U3.2@23.712,61.238 ; v2(38.862,15.494) 33.528,15.494 25.273,23.749 25.273,29.615 U4.2 25.031,32.619 25.031,59.857 23.712,61.177 U3.2@23.712,61.238 ; SPI1.3 44.196,14.75 55.031,25.586 55.031,29.857 U8.2 55.88,33.467 55.88,59.008 U7.2 56.134,63.721 56.134,88.754 U6.2 56.515,94.103 56.515,118.373 U5.2
SPI1_SCK: SPI1.11 U1.1 U2.1 U3.1 U4.1 U5.1 U6.1 U7.1 U8.1 | length 253
  Top Layer w0.254: U1.1 22.269,122.397 22.269,109.214 23.65,107.833 U2.1 23.65,93.627 23.622,93.599 23.471,93.599 22.777,92.905 22.777,92.318 22.269,91.81 22.269,78.921 23.65,77.54 U3.1 22.269,62.397 22.269,49.214 23.65,47.833 U4.1 22.269,32.397 22.269,23.066 33.906,11.43 SPI1.11 36.567,13.961 36.567,14.092 38.616,16.141 47.891,16.141 55.88,24.13 55.88,31.548 U8.1 53.65,47.54 55.031,48.921 55.031,62.397 U7.1 53.65,75.748 55.118,77.216 55.118,92.31 U6.1 55.499,95.627 55.499,121.929 U5.1
SPI2_MISO: R9.2 R10.2 R11.2 R12.2 R13.2 R14.2 R15.2 R16.2 SPI2.7 U9.3 U10.3 U11.3 U12.3 U13.3 U14.3 U15.3 U16.3 | length 281.6
  Bottom Layer w0.254: U12.3 81.615,26.662 80.891,26.662 R12.2 ; U11.3 81.587,56.634 80.764,56.634 R11.2 R11.2@80.193,56.261 ; U10.3 81.44,86.487 R10.2 R10.2@80.193,86.487 ; U9.3 83.519,118.698 81.526,116.705 80.764,116.705 R9.2 80.193,116.332 79.819,115.959 79.819,115.761 78.613,114.554 78.613,88.067 R10.2@80.193,86.487 ; U16.3 113.351,28.698 110.307,25.654 R16.2 ; U15.3 111.214,56.261 R15.2 ; U14.3 111.44,86.487 R14.2 R14.2@109.593,86.487 ; U13.3 111.412,116.459 R13.2 110.038,116.459 109.664,116.086 109.664,115.888 107.95,114.173 107.95,87.94 109.403,86.487 R14.2@109.593,86.487 ; R11.2@80.193,56.261 79.819,56.634 79.819,57.381 77.728,59.473 77.728,84.023 R10.2@80.193,86.487 ; R11.2@80.193,56.261 79.819,55.888 79.819,55.69 77.851,53.721 77.851,27.94 79.502,26.289 R12.2 ; R12.2 80.716,26.289 94.052,12.954 110.744,12.954 SPI2.7 112.268,17.482 110.109,19.641 R16.2 ; R14.2@109.593,86.487 109.22,86.114 109.22,70.993 108.839,70.612 108.839,57.023 109.228,56.634 109.736,56.634 R15.2 ; R16.2 109.911,25.654 109.537,26.027 109.537,26.226 107.061,28.702 107.061,31.877 110.109,34.925 R15.2
SPI2_MOSI: SPI2.3 U9.2 U10.2 U11.2 U12.2 U13.2 U14.2 U15.2 U16.2 | length 263.6
  Top Layer w0.254: v2(81.915,23.749) 81.915,29.503 U12.2
  Bottom Layer w0.254: v2(81.915,23.749) 95.504,10.16 107.714,10.16 116.078,10.16 SPI2.3 117.348,27.54 U16.2 116.205,33.793 116.205,58.683 U15.2 114.07,61.238 116.205,63.373 116.205,88.683 U14.2 114.089,91.238 115.824,92.973 115.824,119.064 U13.2 ; U12.2 83.943,31.238 85.62,32.915 85.62,59.268 U11.2 85.852,63.439 85.852,89.281 83.895,91.238 U10.2 85.979,93.566 85.979,119.253 83.994,121.238 U9.2
SPI2_SCK: SPI2.11 U9.1 U10.1 U11.1 U12.1 U13.1 U14.1 U15.1 U16.1 | length 255.1
  Top Layer w0.254: U9.1 85.031,122.397 85.031,95.159 U10.1 87.245,90.183 87.245,67.372 U11.1 84.523,62.905 84.523,62.318 87.241,59.6 87.241,37.369 U12.1 84.523,32.905 84.523,32.318 85.217,31.624 85.217,24.511 90.424,19.304 99.314,19.304 SPI2.11 107.188,15.113 115.443,23.368 115.443,31.985 U16.1 113.65,47.417 115.443,49.21 115.443,61.985 U15.1 113.65,63.896 113.538,64.008 113.538,73.664 115.316,75.442 115.316,92.112 U14.1 113.65,113.269 115.189,114.808 115.189,122.239 U13.1
pads on no net: SPI1.15 SPI1.16 SPI2.15 SPI2.16

## Polygon pours and split planes (outlines as drawn)
GND on Top Layer "GND_L01_P000" (solid, pour order 0): 144.78,139.954 144.78,0.127 144.907,0 5.08,0 5.08,139.827 4.953,139.954 5.08,139.827 4.953,139.954
GND on Bottom Layer "GND_L02_P001" (solid, pour order 1): 4.953,139.954 144.907,139.954 144.907,0.127 145.034,0 4.953,0

## Keep-outs
Keep-Out Layer:
  the board outline again, w0.254

## Silkscreen, mask and mechanical layers (free items; w line width, h text height)
Top Overlay:
  text "AL3" at 65.913,18.288 h0.76 r90
  text "AL4" at 68.453,18.288 h0.76 r90
  text "AL7" at 70.993,18.288 h0.76 r90
  text "AL8" at 73.533,18.288 h0.76 r90
  text "AL11" at 75.946,18.288 h0.76 r90
  text "AL12" at 78.613,18.288 h0.76 r90
  text "AL15" at 81.153,18.288 h0.76 r90
  text "AL16" at 83.693,18.288 h0.76 r90
  text "MOSI" at 44.577,17.78 h0.76 r90
  text "MOSI" at 117.729,17.78 h0.76 r90
  text "GND" at 31.877,17.653 h0.76 r90
  text "SCK" at 34.417,17.653 h0.76 r90
  text "GND" at 36.957,17.653 h0.76 r90
  text "MISO" at 39.497,17.653 h0.76 r90
  text "GND" at 42.037,17.653 h0.76 r90
  text "3V3" at 47.117,17.653 h0.76 r90
  text "GND" at 105.029,17.653 h0.76 r90
  text "SCK" at 107.569,17.653 h0.76 r90
  text "GND" at 110.109,17.653 h0.76 r90
  text "MISO" at 112.649,17.653 h0.76 r90
  text "GND" at 115.189,17.653 h0.76 r90
  text "3V3" at 120.269,17.653 h0.76 r90
  text "B1" at 39.497,15.113 h0.76 r90
  text "AL1" at 65.913,15.113 h0.76 r90
  text "AL2" at 68.453,15.113 h0.76 r90
  text "AL5" at 70.993,15.113 h0.76 r90
  text "AL6" at 73.533,15.113 h0.76 r90
  text "AL9" at 75.946,15.113 h0.76 r90
  text "AL10" at 78.613,15.113 h0.76 r90
  text "AL13" at 81.153,15.113 h0.76 r90
  text "AL14" at 83.693,15.113 h0.76 r90
  text "B2" at 112.649,15.113 h0.76 r90
  text "GND" at 31.877,14.986 h0.76 r90
  text "C1" at 34.417,14.986 h0.76 r90
  text "GND" at 36.957,14.986 h0.76 r90
  text "GND" at 42.037,14.986 h0.76 r90
  text "A1" at 44.577,14.986 h0.76 r90
  text "3V3" at 47.117,14.986 h0.76 r90
  text "GND" at 105.029,14.986 h0.76 r90
  text "C2" at 107.569,14.986 h0.76 r90
  text "GND" at 110.109,14.986 h0.76 r90
  text "GND" at 115.189,14.986 h0.76 r90
  text "A2" at 117.729,14.986 h0.76 r90
  text "3V3" at 120.269,14.986 h0.76 r90